# Altium PCB EEM_FMC_Carrier.PcbDoc (part 10 of 19)
Units mm, origin at the board's own origin, x right, y up, seen from the top; angles counter-clockwise.
Board outline 222.9 x 100 mm, 6 copper layers (TopLayer, MidLayer1, MidLayer2, SignalLayer1, Internal Plane 1, BottomLayer), stack 1.528 mm thick; 790 components, 743 nets, 3570 pads, 2277 vias.
Unrouted connection lines stored in the file: 3.
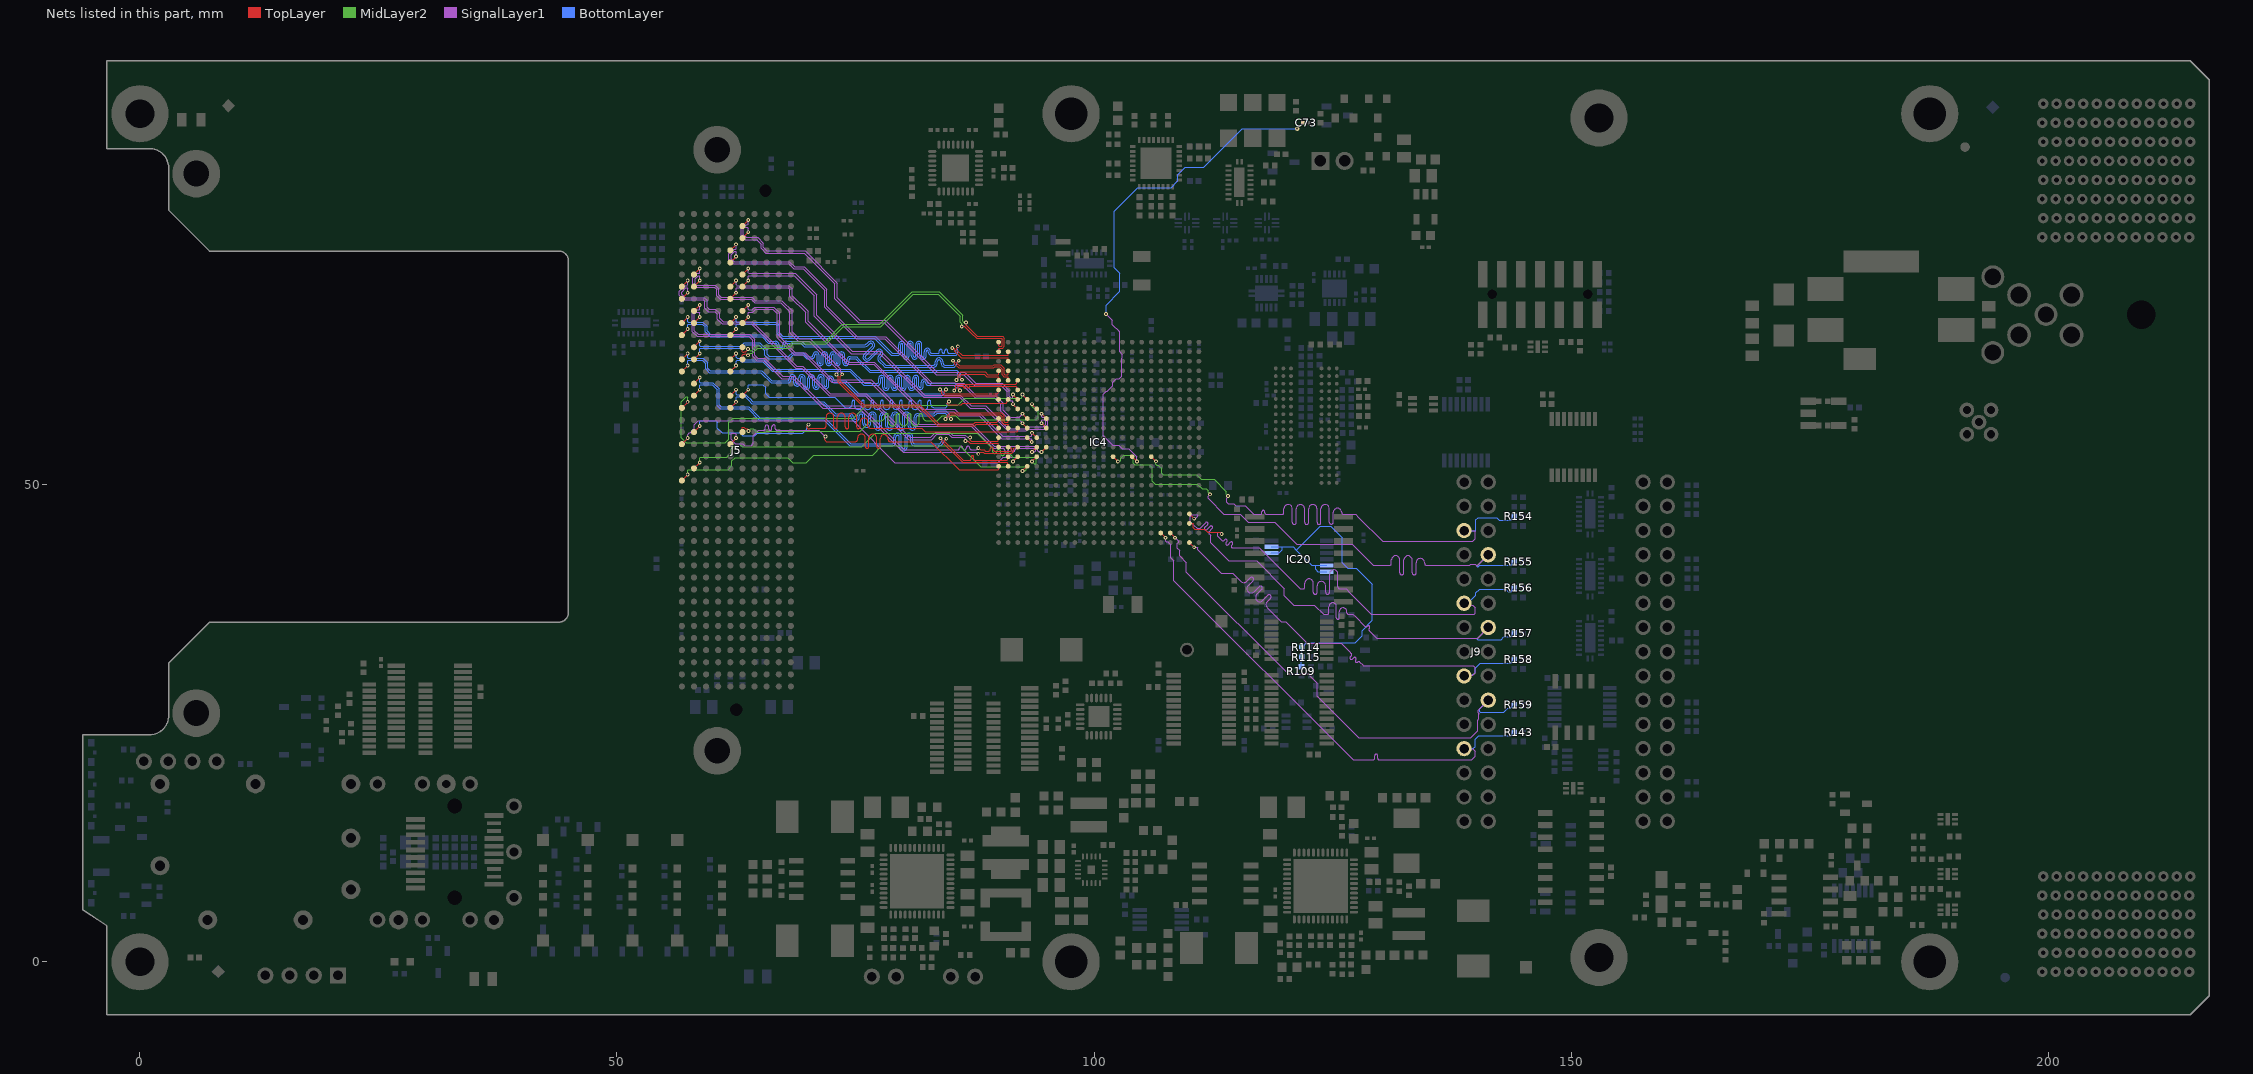
[diagram p12: the nets of this part, all layers, seen from the top]

## Via types
v1: diameter 0.4, hole 0.2, TopLayer to BottomLayer, tented both sides, 1032 vias
v2: diameter 0.5, hole 0.2, TopLayer to BottomLayer, tented both sides, 979 vias
v3: diameter 0.5, hole 0.2, TopLayer to BottomLayer, 162 vias
v4: diameter 0.8, hole 0.5, TopLayer to BottomLayer, tented both sides, 102 vias
v5: diameter 0.6, hole 0.3, TopLayer to BottomLayer, tented both sides, 2 vias

## Nets (pads, with @x,y where several pads share a name; then routed paths per layer and width w, separated by ;. In a path a pad name is that pad's centre, name@x,y a point inside that pad or via, vN(x,y) a via of type N, cw(c..) or ccw(c..) an arc to the next point about the centre after c; other vN are vias at no path point) (continued)
EEM_IO.LVDS_P9: IC4.N17 J9.5 R154.2 | length 63.3
  TopLayer w0.085: IC4.N17@105.998,52.95 106.486,52.462 v1(106.498,52.462)
  MidLayer2 w0.11: v1(106.498,52.462) 106.498,52.139 106.562,52.075 106.752,52.075 107.1,51.726 107.1,51.225 107.263,51.062 110.763,51.062 111.263,50.562 112.613,50.562 113.88,49.295 113.88,49.161 113.88,49.022 114.058,48.843 v1(114.058,48.812)
  SignalLayer1 w0.11: v1(114.058,48.812) 114.058,48.743 113.918,48.603 113.918,48.542 113.918,48.185 114.065,48.038 114.637,48.038 114.875,47.8 115.85,47.8 116.75,46.9 117.138,46.9 117.45,46.9 ccw(c117.45,47.055) 117.605,47.055 117.605,47.163 cw(c117.76,47.163) 117.76,47.318 cw(c117.76,47.163) 117.915,47.163 117.915,47.055 ccw(c118.07,47.055) 118.07,46.9 118.435,46.9 119.525,46.9 119.699,46.9 ccw(c119.699,47.105) 119.904,47.105 119.904,47.475 cw(c120.346,47.475) 120.346,47.917 cw(c120.346,47.475) 120.788,47.475 120.788,46.057 ccw(c120.993,46.057) 120.993,45.852 ccw(c120.993,46.057) 121.198,46.057 121.198,47.475 cw(c121.64,47.475) 121.64,47.917 cw(c121.64,47.475) 122.081,47.475 122.081,46.057 ccw(c122.286,46.057) 122.286,45.852 ccw(c122.286,46.057) 122.491,46.057 122.491,47.475 cw(c122.933,47.475) 122.933,47.917 cw(c122.933,47.475) 123.375,47.475 123.375,46.057 ccw(c123.58,46.057) 123.58,45.852 ccw(c123.58,46.057) 123.785,46.057 123.785,47.475 cw(c124.227,47.475) 124.227,47.917 cw(c124.227,47.475) 124.669,47.475 124.669,46.078 ccw(c124.874,46.078) 124.874,45.873 ccw(c124.874,46.078) 125.079,46.078 125.079,47.105 cw(c125.521,47.105) 125.521,47.547 cw(c125.521,47.105) 125.963,47.105 ccw(c126.168,47.105) 126.168,46.9 127.41,46.9 127.72,46.59 130.247,44.063 139.71,44.063 139.97,44.323 139.97,44.736 139.97,45.142 139.906,45.206 J9.5@138.788,45.206
  BottomLayer w0.085: J9.5@138.788,45.206 139.988,45.206 140.038,45.256 140.038,46.313 140.287,46.562 142.238,46.562 142.494,46.306 143.731,46.306 143.78,46.356 143.78,46.453 R154.2@144.028,46.7
EEM_IO.LVDS_P10: IC4.N13 J9.8 R155.2 | length 60.7
  TopLayer w0.085: IC4.N13@101.998,52.95 v1(102.498,52.45)
  MidLayer2 w0.11: v1(102.498,52.45) 102.554,52.505 102.804,52.505 102.813,52.514 102.813,52.798 103.127,53.112 103.773,53.112 104.112,52.773 104.112,52.263 104.256,52.119 105.791,52.119 106.1,51.81 106.1,50.38 106.405,50.075 110.829,50.075 111.342,49.562 111.763,49.562 111.966,49.359 111.966,49.211 112.145,49.033 v1(112.145,49.002)
  SignalLayer1 w0.11: v1(112.145,49.002) 112.145,48.971 111.966,48.792 111.966,48.584 113.625,46.925 115.335,46.925 116.185,46.075 118.95,46.075 121.263,43.762 127.063,43.762 127.209,43.616 127.307,43.518 128.888,41.937 129.264,41.561 130.8,41.561 130.974,41.561 ccw(c130.974,41.766) 131.179,41.766 131.179,42.119 cw(c131.621,42.119) 131.621,42.561 cw(c131.621,42.119) 132.063,42.119 132.063,40.766 ccw(c132.268,40.766) 132.268,40.561 ccw(c132.268,40.766) 132.473,40.766 132.473,42.119 cw(c132.914,42.119) 132.914,42.561 cw(c132.915,42.119) 133.356,42.119 133.356,40.766 ccw(c133.561,40.766) 133.561,40.561 ccw(c133.561,40.766) 133.766,40.766 133.766,41.837 cw(c134.208,41.837) 134.208,42.279 cw(c134.208,41.837) 134.65,41.837 134.65,41.766 ccw(c134.855,41.766) 134.855,41.561 135.476,41.561 139.376,41.561 139.474,41.659 139.962,41.659 140.096,41.525 140.187,41.525 J9.8@141.328,42.666
  BottomLayer w0.085: J9.8@141.328,42.666 140.168,41.506 140.168,41.436 140.218,41.386 140.288,41.386 140.458,41.556 143.533,41.556 143.72,41.556 143.731,41.556 143.78,41.606 143.78,41.703 R155.2@144.028,41.95
EEM_IO.LVDS_P11: IC4.Y21 J9.11 R156.2 | length 53.1
  TopLayer w0.085: IC4.Y21@109.998,45.95 110.342,45.95 110.392,45.9 110.392,45.505 110.566,45.331 111.619,45.331 111.925,45.025 113.176,45.025 113.36,44.84 v1(113.383,44.84)
  SignalLayer1 w0.11: v1(113.383,44.84) 113.354,44.84 113.173,45.021 113.047,45.021 112.983,44.956 112.983,44.592 113.176,44.399 113.215,44.36 113.408,44.167 ccw(c113.517,44.277) 113.627,44.167 113.702,44.243 cw(c113.812,44.133) 113.922,44.243 cw(c113.812,44.133) 113.922,44.024 113.846,43.948 ccw(c113.956,43.839) 113.846,43.729 ccw(c113.956,43.839) 114.065,43.729 114.299,43.963 cw(c114.409,43.853) 114.518,43.963 cw(c114.409,43.853) 114.518,43.743 114.426,43.652 ccw(c114.536,43.542) 114.536,43.387 114.788,43.387 117.313,43.387 121.613,39.087 121.721,39.087 121.895,39.087 ccw(c121.895,39.292) 122.1,39.292 122.1,39.703 cw(c122.542,39.703) 122.542,40.145 cw(c122.542,39.703) 122.984,39.703 122.984,38.732 ccw(c123.189,38.732) 123.189,38.527 ccw(c123.189,38.732) 123.394,38.732 123.394,39.427 cw(c123.836,39.427) 123.836,39.869 cw(c123.836,39.427) 124.278,39.427 124.278,38.732 ccw(c124.483,38.732) 124.483,38.527 ccw(c124.483,38.732) 124.688,38.732 124.688,40.637 cw(c125.13,40.637) 125.13,41.079 cw(c125.13,40.637) 125.572,40.637 125.572,39.292 ccw(c125.777,39.292) 125.777,39.087 126.438,39.087 126.831,38.694 129.075,36.45 139.865,36.45 139.94,36.525 139.94,37.125 139.689,37.376 138.998,37.376 J9.11@138.788,37.586
  BottomLayer w0.085: J9.11@138.788,37.586 139.198,37.586 140.038,38.426 140.038,38.701 140.412,39.075 143.156,39.075 143.425,38.806 143.731,38.806 143.78,38.856 143.78,38.953 R156.2@144.028,39.2
EEM_IO.LVDS_P12: IC4.W21 J9.14 R157.2 | length 53.3
  TopLayer w0.085: IC4.W21@109.998,46.95 v1(110.498,46.45)
  SignalLayer1 w0.11: v1(110.498,46.45) 110.576,46.45 110.671,46.545 110.699,46.545 110.879,46.725 110.879,46.818 110.815,46.882 110.307,46.882 110.1,46.675 110.1,46.15 110.425,45.825 110.464,45.786 110.825,45.425 111.012,45.425 ccw(c111.012,45.58) 111.122,45.47 111.69,46.038 cw(c111.799,45.929) 111.909,46.038 cw(c111.799,45.929) 111.909,45.819 111.616,45.526 ccw(c111.726,45.417) 111.616,45.307 ccw(c111.726,45.417) 111.835,45.307 112.169,45.641 cw(c112.279,45.531) 112.388,45.641 cw(c112.279,45.531) 112.388,45.422 112.055,45.088 ccw(c112.164,44.978) 112.055,44.869 112.212,44.711 112.212,44.291 112.212,43.938 114.1,42.05 117.035,42.05 119.962,39.123 119.962,38.375 120.944,37.393 123.107,37.393 124.063,36.437 124.3,36.437 124.474,36.437 ccw(c124.474,36.592) 124.629,36.592 124.629,37.239 cw(c125.021,37.239) 125.021,37.631 cw(c125.021,37.239) 125.413,37.239 125.413,36.044 ccw(c125.568,36.044) 125.568,35.889 ccw(c125.568,36.044) 125.723,36.044 125.723,36.712 cw(c126.115,36.712) 126.115,37.104 cw(c126.115,36.712) 126.506,36.712 126.506,36.592 ccw(c126.661,36.592) 126.661,36.437 127.137,36.437 127.375,36.199 128.374,35.199 128.413,35.161 ccw(c128.523,35.27) 128.633,35.161 128.653,35.181 cw(c128.763,35.072) 128.873,35.181 cw(c128.763,35.072) 128.873,34.962 128.852,34.941 ccw(c128.961,34.832) 128.852,34.722 129.136,34.438 129.174,34.399 ; 129.137,34.437 129.174,34.399 ; J9.14@141.328,35.046 140.223,33.941 129.633,33.941 129.174,34.399
  BottomLayer w0.085: J9.14@141.328,35.046 140.168,33.886 140.168,33.816 140.218,33.766 142.666,33.766 142.956,34.056 143.731,34.056 143.78,34.106 143.78,34.203 R157.2@144.028,34.45
EEM_IO.LVDS_P13: IC4.AB21 J9.17 R158.2 | length 50.9
  TopLayer w0.085: IC4.AB21@109.998,43.95 v1(110.498,43.45)
  SignalLayer1 w0.11: v1(110.498,43.45) 110.815,43.45 110.879,43.386 110.879,43.185 113.352,40.713 114.564,40.713 115.276,40.001 115.364,39.913 115.399,39.878 ccw(c115.711,40.191) 116.024,39.878 116.385,40.24 cw(c116.529,40.094) 116.674,40.239 cw(c116.529,40.094) 116.674,39.949 116.146,39.421 ; 116.145,38.795 cw(c116.458,39.108) 116.145,39.42 ; 116.146,38.795 ccw(c116.458,39.108) 116.771,38.795 117.3,39.325 cw(c117.444,39.179) 117.589,39.324 cw(c117.444,39.179) 117.589,39.034 117.061,38.506 ; 117.06,37.88 cw(c117.373,38.193) 117.06,38.505 ; 117.061,37.88 ccw(c117.373,38.193) 117.686,37.88 118.215,38.41 cw(c118.359,38.264) 118.504,38.409 cw(c118.359,38.264) 118.504,38.119 118.144,37.758 ccw(c118.456,37.446) 118.144,37.133 119.18,36.097 119.268,36.009 119.627,35.65 120.09,35.65 122.34,33.4 125.89,33.4 126.732,32.558 126.99,32.3 cw(c126.88,32.191) 126.99,32.081 126.863,31.954 ccw(c126.972,31.845) 126.863,31.735 ccw(c126.972,31.845) 127.082,31.735 127.209,31.862 cw(c127.318,31.752) 127.428,31.862 cw(c127.318,31.752) 127.428,31.643 ccw(c127.538,31.533) 127.428,31.423 ccw(c127.538,31.533) 127.647,31.423 cw(c127.757,31.314) 127.866,31.423 128.167,31.123 128.24,31.05 139.74,31.05 139.94,30.85 139.94,30.3 139.689,30.049 138.871,30.049 J9.17@138.788,29.966
  BottomLayer w0.085: J9.17@138.788,29.966 138.861,30.039 139.666,30.039 139.952,30.325 139.952,30.777 140.481,31.306 143.731,31.306 143.78,31.356 143.78,31.452 R158.2@144.028,31.7
EEM_IO.LVDS_P14: IC4.AA19 J9.20 R159.2 | length 53
  TopLayer w0.085: IC4.AA19@107.998,44.95 v1(108.498,44.45)
  SignalLayer1 w0.11: v1(108.498,44.45) 108.869,44.079 108.869,43.988 108.735,43.854 108.735,43.362 108.975,43.122 108.975,42.54 109.663,41.852 109.663,40.852 120.34,30.175 122.413,30.175 123.388,29.2 123.388,27.852 127.752,23.488 139.498,23.488 140.223,24.213 140.223,25.344 140.35,25.471 140.35,25.957 140.303,26.004 140.303,26.079 140.291,26.091 140.291,26.389 J9.20@141.328,27.426
  BottomLayer w0.085: J9.20@141.328,27.426 140.425,26.523 140.425,26.219 140.498,26.146 141.3,26.146 142.952,26.146 143.362,26.556 143.654,26.556 144.028,26.93 R159.2@144.028,26.95
EEM_IO.LVDS_P15: IC4.AA18 J9.23 R143.2 | length 54.3
  TopLayer w0.085: IC4.AA18@106.998,44.95 v1(107.498,44.45)
  SignalLayer1 w0.11: v1(107.498,44.45) 107.498,44.089 107.562,44.025 107.752,44.025 108.042,43.735 108.042,42.358 108.375,42.025 108.375,39.96 127.148,21.187 128.875,21.187 129.265,21.187 ccw(c129.265,21.342) 129.42,21.342 129.42,21.619 cw(c129.575,21.619) 129.575,21.774 cw(c129.575,21.619) 129.73,21.619 129.73,21.342 ccw(c129.885,21.342) 129.885,21.187 130.25,21.187 ; 130.225,21.187 130.25,21.187 ; J9.23@138.788,22.346 138.808,22.326 139.689,22.326 139.94,22.075 139.94,21.55 139.577,21.187 130.25,21.187
  BottomLayer w0.085: J9.23@138.788,22.346 138.82,22.378 139.753,22.378 139.938,22.563 139.938,23.307 140.312,23.681 143.572,23.681 143.733,23.681 143.783,23.731 143.783,23.803 R143.2@144.03,24.05
FAN_PWM: C73.2 IC4.N15 | length 55.9
  TopLayer w0.125: IC4.N15@103.998,52.95 v1(104.498,52.45) ; v2(121.298,87.325) 121.736,87.763 121.736,87.813 121.873,87.95 C73.2@121.898,87.95
  SignalLayer1 w0.125: v1(101.273,67.9) 101.273,67.875 101.923,67.225 101.923,66.796 102.648,66.071 102.648,66.05 102.673,66.025 102.673,63.929 102.987,63.615 102.987,63.335 102.922,63.27 102.922,61.395 102.638,61.112 102.31,61.112 101.958,60.76 101.958,60.389 101.394,59.825 101.298,59.825 100.973,59.5 100.973,55.125 101.948,54.15 102.573,54.15 102.935,53.788 103.638,53.788 104.498,52.929 v1(104.498,52.45)
  BottomLayer w0.125: v1(101.273,67.9) 101.273,68.825 102.723,70.275 102.723,72.175 102.123,72.775 102.123,78.7 104.562,81.138 108.089,81.138 108.8,81.85 108.8,82.525 109.575,83.3 111.5,83.3 115.525,87.325 v2(121.298,87.325)
FLASH_UP_EN: IC20.5 IC20.6 IC20.12 IC20.13 R109.2 R114.2 R115.2 | length 37.7
  BottomLayer w0.115: IC20.12@118.598,42.85 118.628,42.88 119.428,42.88 119.735,43.187 119.735,43.5 ; IC20.13@118.598,43.5 119.735,43.5 ; R109.2@121.748,30.92 R115.2@121.748,31.94 ; R115.2@121.778,31.95 121.778,32.97 122.01,33.202 122.022,33.202 122.244,33.425 127.383,33.425 128.119,34.161 128.119,34.719 129.184,35.784 129.184,39.566 127.5,41.25 126.575,41.25 125.998,41.827 125.998,44.475 124.798,45.675 123.723,45.675 121.211,43.163 ; IC20.6@124.398,40.9 123.473,40.9 123.223,41.15 123.223,41.55 ; IC20.5@124.398,41.55 123.223,41.55 ; 119.735,43.5 120.873,43.5 121.211,43.163 ; 121.211,43.163 122.823,41.55 123.223,41.55
FMC.HA_N0: IC4.J4 J5.f5 | length 42.2
  TopLayer w0.085: J5.f5@61.878,73.309 62.488,73.919 v1(62.488,73.94) ; v1(92.498,57.45) IC4.J4@92.998,56.95
  SignalLayer1 w0.11: v1(62.488,73.94) 62.488,74.392 62.424,74.457 62.332,74.457 61.975,74.099 61.975,73.685 62.266,73.394 68.081,73.394 68.613,72.862 69.623,72.862 72,70.485 72,68.7 75.163,65.537 78.163,65.537 83.013,60.687 85.417,60.687 85.438,60.665 86.335,60.665 87.663,59.337 89.661,59.337 90.475,58.523 90.475,57.8 91.206,57.069 92.175,57.069 92.498,57.392 v1(92.498,57.45)
FMC.HA_N1: IC4.G3 J5.e3 | length 40.5
  TopLayer w0.085: J5.e3@63.148,75.849 63.758,76.459 v1(63.758,76.48) ; v1(91.498,59.45) IC4.G3@91.998,58.95
  SignalLayer1 w0.11: v1(63.758,76.48) 63.758,76.913 63.675,76.997 63.325,76.997 63.25,76.922 63.25,76.225 63.55,75.925 64.735,75.925 65.337,75.323 65.337,74.875 65.687,74.525 69.71,74.525 73.087,71.148 73.087,69.588 75.45,67.225 78.125,67.225 83.575,61.775 86.435,61.775 87.585,60.625 88.498,60.625 90.375,60.625 91.133,59.867 91.133,59.278 91.342,59.069 91.434,59.069 91.498,59.133 v1(91.498,59.45)
FMC.HA_N2: IC4.L1 J5.k8 | length 43.7
  TopLayer w0.085: J5.k8@56.798,69.499 57.408,70.109 v1(57.408,70.13) ; v1(87.023,54.951) 87.012,54.94 87.012,54.673 87.129,54.556 88.498,54.556 89.9,54.556 ; 89.9,54.556 89.966,54.622 89.966,54.918 IC4.L1@89.998,54.95
  SignalLayer1 w0.11: v1(57.408,70.13) 57.408,70.582 57.344,70.647 57.216,70.647 56.775,70.205 56.775,69.987 57.137,69.625 59.15,69.625 59.45,69.325 59.45,68.61 59.673,68.387 60.323,68.387 60.75,67.96 60.75,67.475 61.113,67.112 64.163,67.112 68.838,62.437 69.463,62.437 72.338,59.562 76.113,59.562 80.7,54.975 82.89,54.975 83.427,55.512 84.863,55.512 85.169,55.206 86.517,55.206 86.749,54.974 87,54.974 v1(87.023,54.951)
FMC.HA_N3: IC4.J1 J5.j7 | length 43.3
  TopLayer w0.085: J5.j7@58.068,70.769 58.678,71.379 v1(58.678,71.4) ; v1(73.609,61.582) 73.601,61.582 73.409,61.39 73.409,60.864 75.885,58.387 81.713,58.387 83.709,56.39 87.412,56.39 87.578,56.556 89.787,56.556 89.919,56.687 89.919,56.871 IC4.J1@89.998,56.95
  SignalLayer1 w0.11: v1(58.678,71.4) 58.678,71.852 58.614,71.917 58.522,71.917 58.2,71.594 58.2,71.001 58.264,70.937 60.311,70.937 60.675,70.573 60.675,69.912 60.925,69.662 64.163,69.662 64.513,69.312 67.261,69.312 68.35,68.223 68.35,66.05 69.113,65.287 70.264,65.287 73.428,62.123 73.428,61.792 73.609,61.61 v1(73.609,61.582)
FMC.HA_N4: IC4.L4 J5.f8 | length 40.9
  TopLayer w0.085: J5.f8@61.878,69.499 62.488,70.109 v1(62.488,70.13) ; IC4.L4@92.998,54.95 v1(93.473,54.475)
  SignalLayer1 w0.11: v1(62.488,70.13) 62.488,70.582 62.552,70.647 67.928,70.647 68.125,70.45 68.125,69.738 69.788,68.075 69.788,67.027 74.19,62.625 76.89,62.625 81.84,57.675 85.315,57.675 85.765,57.225 87.965,57.225 90.346,54.844 93.421,54.844 93.485,54.78 93.485,54.487 v1(93.473,54.475)
FMC.HA_N5: IC4.J6 J5.e7 | length 43.4
  TopLayer w0.085: J5.e7@63.148,70.769 63.758,71.379 v1(63.758,71.4) ; v1(94.498,57.45) IC4.J6@94.998,56.95
  SignalLayer1 w0.11: v1(63.758,71.4) 63.758,71.852 63.822,71.917 68.584,71.917 70.675,69.825 70.675,67.665 74.577,63.763 77.537,63.763 82.137,59.163 85.902,59.163 87.027,58.038 88.498,58.038 88.562,58.038 90.937,55.663 92.923,55.663 93.085,55.825 94.768,55.825 95.167,56.224 95.167,56.76 94.859,57.069 94.562,57.069 94.498,57.133 v1(94.498,57.45)
FMC.HA_N6: IC4.D2 J5.k11 | length 45.4
  TopLayer w0.085: J5.k11@56.798,65.689 57.408,66.299 v1(57.408,66.32) ; v1(85.825,63.008) 85.825,63.003 85.631,62.809 85.631,62.733 85.902,62.462 89.412,62.462 89.519,62.569 90.231,62.569 90.591,62.208 90.591,61.606 90.641,61.556 90.948,61.556 90.998,61.606 IC4.D2@90.998,61.95
  BottomLayer w0.085: v1(57.408,66.32) 57.408,66.799 57.458,66.849 58.926,66.849 59.225,66.55 59.225,66.05 59.75,65.525 65.2,65.525 65.225,65.5 65.875,64.85 66.11,64.85 66.582,64.85 cw(c66.582,64.658) 66.775,64.658 66.775,64.578 ccw(c67.179,64.578) 67.179,64.173 ccw(c67.179,64.578) 67.584,64.578 67.584,64.658 cw(c67.776,64.658) 67.776,64.85 67.925,64.85 69.275,64.85 69.65,64.475 75.6,64.475 75.915,64.475 ccw(c75.916,65.091) 76.35,64.654 76.468,64.772 ; 76.469,64.773 cw(c76.605,64.637) 76.741,64.773 cw(c76.605,64.637) 76.741,64.501 75.869,63.628 75.869,63.624 ccw(c76.186,63.373) 75.9,63.087 ccw(c76.186,63.373) 76.472,63.087 77.321,63.936 ; 77.321,63.937 cw(c77.457,63.8) 77.593,63.937 cw(c77.457,63.8) 77.593,63.664 77.451,63.522 ccw(c77.737,63.236) 77.451,62.949 ; 77.451,62.949 77.65,62.75 77.786,62.614 78.062,62.338 83.025,62.338 83.174,62.338 ccw(c83.174,62.742) 83.578,62.742 83.578,62.894 cw(c83.771,62.894) 83.771,63.087 cw(c83.771,62.894) 83.963,62.894 83.963,62.742 ccw(c84.368,62.742) 84.368,62.338 84.821,62.338 85.331,62.338 85.631,62.637 85.631,62.809 85.825,63.003 v1(85.825,63.008)
FMC.HA_N7: IC4.M2 J5.j10 | length 45.4
  TopLayer w0.085: J5.j10@58.068,66.959 58.678,67.569 v1(58.678,67.59) ; v1(87.873,53.85) 87.932,53.85 87.932,53.841 88.123,53.65 88.5,53.65 88.607,53.543 88.95,53.543 88.993,53.543 ccw(c88.993,53.686) 89.135,53.686 89.135,53.786 cw(c89.278,53.786) 89.278,53.928 cw(c89.278,53.786) 89.42,53.786 89.42,53.686 ccw(c89.563,53.686) 89.563,53.543 89.75,53.543 91.291,53.543 91.392,53.644 91.392,53.821 91.342,53.871 91.077,53.871 IC4.M2@90.998,53.95
  SignalLayer1 w0.11: v1(58.678,67.59) 58.678,68.042 58.614,68.107 58.294,68.107 58.118,67.93 58.118,66.168 58.498,65.787 63.923,65.787 64.45,65.26 64.45,63.562 64.75,63.262 65.472,63.262 67.372,61.362 68.563,61.362 71.663,58.262 75.513,58.262 80.106,53.669 85.275,53.669 85.72,53.669 ccw(c85.72,53.849) 85.9,53.849 cw(c86.08,53.849) 86.26,53.849 ccw(c86.44,53.849) 86.62,53.849 86.62,53.855 cw(c86.8,53.855) 86.98,53.855 86.98,53.849 ccw(c87.16,53.849) 87.16,53.669 87.575,53.669 87.664,53.669 87.845,53.85 v1(87.873,53.85)
FMC.HA_N8: IC4.B2 J5.f11 | length 43.2
  TopLayer w0.085: J5.f11@61.878,65.689 62.488,66.299 v1(62.488,66.32) ; v1(85.723,64.517) 85.723,64.432 85.615,64.324 85.615,64.11 86.169,63.556 90.948,63.556 90.998,63.606 IC4.B2@90.998,63.95
  BottomLayer w0.085: v1(62.488,66.32) 62.488,66.799 62.538,66.849 66.626,66.849 66.813,66.662 66.813,65.837 67.3,65.35 76.975,65.35 78.762,63.563 79.25,63.563 79.399,63.563 ccw(c79.399,63.893) 79.728,63.893 79.728,64.697 cw(c79.846,64.697) 79.963,64.697 79.963,63.504 ccw(c80.293,63.504) 80.622,63.504 80.622,64.697 cw(c80.74,64.697) 80.857,64.697 80.857,63.504 ccw(c81.187,63.504) 81.516,63.504 81.516,64.697 cw(c81.634,64.697) 81.751,64.697 81.751,63.504 ccw(c82.081,63.504) 82.41,63.504 82.41,63.971 cw(c82.528,63.971) 82.645,63.971 82.645,63.893 ccw(c82.975,63.893) 82.975,63.563 83.425,63.563 85.549,63.563 85.723,63.737 85.723,64.113 85.597,64.239 85.597,64.31 85.723,64.436 v1(85.723,64.517)
FMC.HA_N9: IC4.M5 J5.e10 | length 41.3
  TopLayer w0.085: J5.e10@63.148,66.959 63.758,67.569 v1(63.758,67.59) ; v1(93.498,53.45) IC4.M5@93.998,53.95
  SignalLayer1 w0.11: v1(63.758,67.59) 63.758,68.042 63.822,68.107 64.254,68.107 64.534,68.387 66.339,68.387 66.813,67.912 66.813,65.4 68.588,63.625 69.64,63.625 72.49,60.775 76.54,60.775 81.19,56.125 87.125,56.125 89.425,53.825 90.041,53.825 90.456,53.825 cw(c90.456,53.645) 90.636,53.645 ; 90.636,53.644 ccw(c90.816,53.644) 90.996,53.644 ; 90.996,53.645 cw(c91.176,53.645) 91.356,53.645 ccw(c91.536,53.645) 91.716,53.645 cw(c91.896,53.645) 91.896,53.825 92.154,53.825 93.8,53.825 93.88,53.745 93.88,53.575 93.774,53.47 93.518,53.47 v1(93.498,53.45)
FMC.HA_N10: IC4.F1 J5.k14 | length 45.7
  TopLayer w0.085: J5.k14@56.798,61.879 57.408,62.489 v1(57.408,62.51) ; v1(84.473,59.975) 84.277,59.778 84.277,59.648 84.369,59.556 89.875,59.556 89.952,59.633 89.952,59.904 IC4.F1@89.998,59.95
  BottomLayer w0.085: v1(57.408,62.51) 57.408,62.989 57.458,63.039 58.961,63.039 59.288,62.712 59.288,62.149 59.674,61.763 65.062,61.763 66.15,60.675 67.74,60.675 67.888,60.675 ccw(c67.888,61.029) 68.243,61.029 68.243,61.178 cw(c68.385,61.178) 68.385,61.32 cw(c68.385,61.178) 68.528,61.178 68.528,60.706 ccw(c68.882,60.706) 68.882,60.352 ccw(c68.882,60.706) 69.237,60.706 69.237,61.178 cw(c69.379,61.178) 69.379,61.32 cw(c69.379,61.178) 69.522,61.178 69.522,60.373 ccw(c69.876,60.373) 69.876,60.019 ccw(c69.876,60.373) 70.231,60.373 70.231,61.178 cw(c70.373,61.178) 70.373,61.32 cw(c70.373,61.178) 70.516,61.178 70.516,60.373 ccw(c70.87,60.373) 70.87,60.019 ccw(c70.87,60.373) 71.225,60.373 71.225,61.178 cw(c71.367,61.178) 71.367,61.32 cw(c71.367,61.178) 71.51,61.178 71.51,60.441 ccw(c71.864,60.441) 71.864,60.087 ccw(c71.864,60.441) 72.219,60.441 72.219,61.03 cw(c72.361,61.03) 72.361,61.172 cw(c72.361,61.03) 72.504,61.03 ccw(c72.858,61.029) 72.858,60.675 73.27,60.675 73.875,60.675 75.237,59.313 84.03,59.313 84.279,59.562 84.279,59.776 84.473,59.97 v1(84.473,59.975)
FMC.HA_N11: IC4.D1 J5.j13 | length 44.6
  TopLayer w0.085: J5.j13@58.068,63.149 58.678,63.759 v1(58.678,63.78) ; v1(85.575,60.996) 85.575,61.008 85.766,61.199 85.766,61.366 85.769,61.369 85.769,61.544 86.05,61.825 88.586,61.825 88.855,61.556 89.948,61.556 89.998,61.606 IC4.D1@89.998,61.95
  BottomLayer w0.085: v1(58.678,63.78) 58.678,64.259 58.728,64.309 63.034,64.309 63.425,64.7 64.875,64.7 65.513,64.062 65.513,63.587 65.862,63.238 68.088,63.238 68.5,63.65 69.45,63.65 69.875,63.225 70.266,63.225 70.414,63.225 ccw(c70.414,63.555) 70.744,63.555 70.744,63.594 cw(c70.861,63.594) 70.979,63.594 70.979,62.827 ccw(c71.308,62.827) 71.638,62.827 71.638,63.594 cw(c71.755,63.594) 71.873,63.594 71.873,62.827 ccw(c72.202,62.827) 72.532,62.827 72.532,63.594 cw(c72.649,63.594) 72.767,63.594 72.767,62.827 ccw(c73.096,62.827) 73.426,62.827 73.426,63.594 cw(c73.543,63.594) 73.661,63.594 73.661,62.827 ccw(c73.99,62.827) 74.32,62.827 74.32,63.108 cw(c74.437,63.108) 74.437,63.225 75.025,63.225 75.312,62.938 76.475,61.775 85.55,61.775 85.769,61.556 85.769,61.195 85.575,61.001 v1(85.575,60.996)
FMC.HA_N12: IC4.E3 J5.f14 | length 45.4
  TopLayer w0.085: J5.f14@61.878,61.879 62.488,62.489 v1(62.488,62.51) ; v1(85.348,59.9) 85.348,59.93 85.525,60.107 85.525,60.375 85.706,60.556 86.187,60.556 91.812,60.556 91.92,60.664 91.92,60.872 IC4.E3@91.998,60.95
  BottomLayer w0.085: v1(62.488,62.51) 62.488,62.927 62.6,63.039 62.895,63.039 63.021,62.913 65.287,62.913 66.284,61.916 74.384,61.916 75.887,60.413 77.15,60.413 77.299,60.413 ccw(c77.299,60.742) 77.628,60.742 77.628,61.132 cw(c77.746,61.132) 77.863,61.132 77.863,60.216 ccw(c78.193,60.216) 78.522,60.216 78.522,61.132 cw(c78.64,61.132) 78.757,61.132 78.757,60.216 ccw(c79.087,60.216) 79.416,60.216 79.416,61.132 cw(c79.534,61.132) 79.651,61.132 79.651,60.216 ccw(c79.981,60.216) 80.31,60.216 80.31,61.132 cw(c80.428,61.132) 80.545,61.132 80.545,60.216 ccw(c80.875,60.216) 81.204,60.216 81.204,61.132 cw(c81.322,61.132) 81.439,61.132 81.439,60.31 ccw(c81.769,60.31) 82.098,60.31 82.098,60.743 cw(c82.216,60.743) 82.333,60.743 ccw(c82.663,60.742) 82.663,60.413 83.425,60.413 85.304,60.413 85.542,60.175 85.542,60.099 85.348,59.905 v1(85.348,59.9)
FMC.HA_N13: IC4.A1 J5.e13 | length 34.5
  TopLayer w0.085: J5.e13@63.148,63.149 63.148,63.601 63.225,63.678 63.383,63.678 63.445,63.74 63.516,63.74 63.681,63.575 v1(63.723,63.575) ; v1(86.142,66.608) 86.145,66.604 86.419,66.604 87.087,65.936 87.686,65.338 90.325,65.338 90.4,65.263 90.4,64.597 90.35,64.548 90.048,64.548 89.998,64.597 IC4.A1@89.998,64.95
  MidLayer2 w0.11: v1(63.723,63.575) 63.942,63.794 64.2,63.794 64.731,64.325 68.043,64.325 68.499,64.781 71.916,64.781 73.71,66.575 77.635,66.575 81.06,70 83.675,70 85.983,67.692 85.983,67.023 86.122,66.884 86.122,66.628 v1(86.142,66.608)
FMC.HA_N14: IC4.N2 J5.j16 | length 44.8
  TopLayer w0.085: J5.j16@58.068,59.339 58.678,59.949 v1(58.678,59.97) ; v1(84.521,54.823) 84.521,54.816 84.328,54.623 84.328,54.547 86.32,52.556 86.525,52.556 86.977,52.556 ccw(c86.977,52.699) 87.12,52.699 87.12,52.899 cw(c87.262,52.899) 87.262,53.042 cw(c87.262,52.899) 87.405,52.899 87.405,52.699 ccw(c87.547,52.699) 87.547,52.556 87.875,52.556 90.85,52.556 90.939,52.645 90.939,52.891 IC4.N2@90.998,52.95
  BottomLayer w0.085: v1(58.678,59.97) 58.678,60.449 58.728,60.499 59.964,60.499 60.488,59.975 60.488,58.312 60.837,57.963 63.737,57.963 64.864,56.836 71.664,56.836 74.412,54.088 78.175,54.088 78.818,54.088 ccw(c78.818,54.492) 79.223,54.492 79.223,54.995 cw(c79.415,54.995) 79.415,55.187 cw(c79.415,54.995) 79.608,54.995 79.608,53.959 ccw(c80.012,53.959) 80.012,53.555 ccw(c80.012,53.959) 80.417,53.959 80.417,54.995 cw(c80.609,54.995) 80.609,55.187 cw(c80.609,54.995) 80.802,54.995 80.802,54.492 ccw(c81.206,54.492) 81.206,54.088 81.952,54.088 83.15,54.088 83.378,54.088 cw(c83.378,53.996) 83.47,53.996 83.47,53.952 ccw(c83.563,53.952) 83.563,53.86 ccw(c83.563,53.952) 83.655,53.952 83.655,53.996 cw(c83.748,53.996) 83.748,54.088 83.898,54.088 83.971,54.161 84.328,54.519 84.328,54.623 84.521,54.816 v1(84.521,54.823)
FMC.HA_N15: IC4.J2 J5.f17 | length 47.4
  TopLayer w0.085: J5.f17@61.878,58.069 62.488,58.679 v1(62.488,58.7) ; v1(84.423,56.892) 84.423,56.897 84.617,57.091 84.617,57.249 84.93,57.562 90.263,57.562 90.591,57.233 90.591,56.606 90.641,56.556 90.948,56.556 90.998,56.606 IC4.J2@90.998,56.95
  BottomLayer w0.085: v1(62.488,58.7) 62.488,59.179 62.538,59.229 63.421,59.229 63.75,58.9 64.15,58.5 71.6,58.5 72.85,57.25 73.44,57.25 74.387,57.25 cw(c74.387,57.058) 74.58,57.058 ccw(c74.984,57.057) 74.984,56.653 ccw(c74.984,57.057) 75.389,57.057 75.389,57.217 cw(c75.581,57.217) 75.581,57.409 cw(c75.581,57.217) 75.774,57.217 75.774,56.429 ccw(c76.178,56.429) 76.178,56.024 ccw(c76.178,56.429) 76.583,56.429 76.583,57.217 cw(c76.775,57.217) 76.775,57.409 cw(c76.775,57.217) 76.968,57.217 76.968,56.137 ccw(c77.372,56.137) 77.372,55.733 ccw(c77.372,56.137) 77.777,56.137 77.777,57.217 cw(c77.969,57.217) 77.969,57.409 cw(c77.969,57.217) 78.162,57.217 78.162,56.137 ccw(c78.566,56.137) 78.566,55.733 ccw(c78.566,56.137) 78.971,56.137 78.971,57.217 cw(c79.163,57.217) 79.163,57.409 cw(c79.163,57.217) 79.356,57.217 79.356,56.137 ccw(c79.76,56.137) 79.76,55.733 ccw(c79.76,56.137) 80.165,56.137 80.165,57.217 cw(c80.357,57.217) 80.357,57.409 cw(c80.357,57.217) 80.55,57.217 80.55,56.137 ccw(c80.954,56.137) 80.954,55.733 ccw(c80.954,56.137) 81.359,56.137 81.359,57.058 cw(c81.551,57.058) 81.551,57.25 81.7,57.25 83.275,57.25 83.55,57.525 84.392,57.525 84.617,57.3 84.617,57.167 84.617,57.091 84.423,56.897 v1(84.423,56.892)
FMC.HA_N16: IC4.G2 J5.e16 | length 44.7
  TopLayer w0.085: J5.e16@63.148,59.339 63.758,59.949 v1(63.758,59.97) ; v1(84.81,58.733) 84.776,58.733 84.597,58.553 84.597,58.477 84.67,58.404 86.104,58.404 86.256,58.556 90.787,58.556 90.919,58.687 90.919,58.871 IC4.G2@90.998,58.95
  BottomLayer w0.085: v1(63.758,59.97) 63.758,60.449 63.808,60.499 65.301,60.499 65.588,60.212 65.588,59.562 65.95,59.2 72.825,59.2 73.937,58.088 74.142,58.088 74.29,58.088 ccw(c74.29,58.442) 74.645,58.442 74.645,58.72 cw(c74.787,58.72) 74.787,58.862 cw(c74.787,58.72) 74.93,58.72 74.93,58.244 ccw(c75.284,58.244) 75.284,57.889 ccw(c75.284,58.244) 75.639,58.244 75.639,58.72 cw(c75.781,58.72) 75.781,58.862 cw(c75.781,58.72) 75.924,58.72 75.924,58.244 ccw(c76.278,58.244) 76.278,57.889 ccw(c76.278,58.244) 76.633,58.244 76.633,58.72 cw(c76.775,58.72) 76.775,58.862 cw(c76.775,58.72) 76.918,58.72 76.918,58.244 ccw(c77.272,58.244) 77.272,57.889 ccw(c77.272,58.244) 77.627,58.244 77.627,58.72 cw(c77.769,58.72) 77.769,58.862 cw(c77.769,58.72) 77.912,58.72 77.912,58.244 ccw(c78.266,58.244) 78.266,57.889 ccw(c78.266,58.244) 78.621,58.244 78.621,58.72 cw(c78.763,58.72) 78.763,58.862 cw(c78.763,58.72) 78.906,58.72 78.906,58.244 ccw(c79.26,58.244) 79.26,57.889 ccw(c79.26,58.244) 79.615,58.244 79.615,58.72 cw(c79.757,58.72) 79.757,58.862 cw(c79.757,58.72) 79.9,58.72 79.9,58.244 ccw(c80.254,58.244) 80.254,57.889 ccw(c80.254,58.244) 80.609,58.244 80.609,58.72 cw(c80.751,58.72) 80.751,58.862 cw(c80.751,58.72) 80.894,58.72 80.894,58.244 ccw(c81.248,58.244) 81.248,57.889 ccw(c81.248,58.244) 81.603,58.244 81.603,58.72 cw(c81.745,58.72) 81.745,58.862 cw(c81.745,58.72) 81.888,58.72 81.888,58.244 ccw(c82.242,58.244) 82.242,57.889 ccw(c82.242,58.244) 82.597,58.244 82.597,58.72 cw(c82.739,58.72) 82.739,58.862 cw(c82.739,58.72) 82.882,58.72 82.882,58.442 ccw(c83.236,58.442) 83.236,58.088 84.22,58.088 84.437,58.088 84.611,58.262 84.611,58.539 84.804,58.733 v1(84.81,58.733)
FMC.HA_N17: IC4.G4 J5.k17 | length 46
  TopLayer w0.085: J5.k17@56.798,58.069 57.408,58.679 v1(57.408,58.7) ; v1(92.498,59.45) IC4.G4@92.998,58.95
  MidLayer2 w0.11: v1(57.408,58.7) 57.408,59.152 57.344,59.217 57.252,59.217 56.75,58.714 56.75,54.925 57.282,54.393 61.332,54.393 61.738,54.798 61.738,56.598 62.115,56.975 74.79,56.975 76.152,58.337 85.727,58.337 86.465,59.075 88.498,59.075 89.572,59.075 92.378,59.075 92.442,59.139 92.442,59.395 v1(92.498,59.45)
FMC.HA_N18: IC4.K3 J5.j19 | length 47.2
  TopLayer w0.085: J5.j19@58.068,55.529 58.678,56.139 v1(58.678,56.16) ; v1(70.073,56.3) 70.073,56.294 69.879,56.1 69.879,56.025 70.004,55.9 70.205,55.9 70.254,55.95 71.575,55.95 71.724,55.95 ccw(c71.724,56.142) 71.916,56.142 71.916,57.104 cw(c72.321,57.104) 72.321,57.508 cw(c72.321,57.104) 72.725,57.104 72.725,56.083 ccw(c72.918,56.083) 72.918,55.891 ccw(c72.918,56.083) 73.11,56.083 73.11,57.104 cw(c73.515,57.104) 73.515,57.508 cw(c73.515,57.104) 73.919,57.104 73.919,56.083 ccw(c74.112,56.083) 74.112,55.891 ccw(c74.112,56.083) 74.304,56.083 74.304,57.104 cw(c74.709,57.104) 74.709,57.508 cw(c74.709,57.104) 75.113,57.104 75.113,56.083 ccw(c75.306,56.083) 75.306,55.891 ccw(c75.306,56.083) 75.498,56.083 75.498,56.584 cw(c75.903,56.584) 75.903,56.988 cw(c75.903,56.584) 76.307,56.584 76.307,56.142 ccw(c76.5,56.142) 76.5,55.95 77.491,55.95 81.034,55.95 ; 81.035,55.95 81.925,55.95 82.33,55.545 91.948,55.545 91.998,55.595 IC4.K3@91.998,55.95
  BottomLayer w0.085: v1(58.678,56.16) 58.678,56.639 58.728,56.689 60.361,56.689 60.5,56.55 60.525,56.525 60.525,55.937 61.024,55.438 62.887,55.438 63.206,55.119 64.419,55.119 64.713,55.413 69.463,55.413 69.879,55.829 69.879,56.101 70.073,56.295 v1(70.073,56.3)
FMC.HA_N19: IC4.P1 J5.f20 | length 41.8
  TopLayer w0.085: J5.f20@61.878,54.259 62.488,54.869 v1(62.488,54.89) ; v1(71.853,55.076) 71.793,55.016 71.793,54.894 71.768,54.869 71.768,54.698 71.928,54.537 74.875,54.537 75.024,54.537 ccw(c75.024,54.729) 75.216,54.729 75.216,54.909 cw(c75.621,54.909) 75.621,55.313 cw(c75.621,54.909) 76.025,54.909 76.025,54.021 ccw(c76.218,54.021) 76.218,53.829 ccw(c76.218,54.021) 76.41,54.021 76.41,54.909 cw(c76.815,54.909) 76.815,55.313 cw(c76.815,54.909) 77.219,54.909 77.219,54.021 ccw(c77.412,54.021) 77.412,53.829 ccw(c77.412,54.021) 77.604,54.021 77.604,54.842 cw(c78.009,54.842) 78.009,55.247 cw(c78.009,54.842) 78.413,54.842 78.413,54.729 ccw(c78.606,54.729) 78.606,54.537 79.13,54.537 82.888,54.537 85.869,51.556 89.948,51.556 89.998,51.606 IC4.P1@89.998,51.95
  SignalLayer1 w0.11: v1(62.488,54.89) 62.488,55.294 62.375,55.407 62.05,55.407 61.95,55.307 61.95,54.75 62.4,54.3 63.2,54.3 63.407,54.093 64.057,54.093 64.3,54.335 64.3,55.135 64.877,55.712 65.05,55.712 65.345,55.712 ccw(c65.345,55.892) 65.525,55.892 65.525,56.085 cw(c65.705,56.085) 65.885,56.085 65.885,55.892 ccw(c66.065,55.892) 66.245,55.892 66.245,56.103 cw(c66.425,56.103) 66.605,56.103 66.605,55.892 ccw(c66.785,55.892) 66.785,55.712 67.2,55.712 71.135,55.712 71.599,55.248 71.664,55.183 71.668,55.183 71.775,55.076 v1(71.853,55.076)
FMC.HA_N20: IC4.H5 J5.e19 | length 42.5
  TopLayer w0.085: J5.e19@63.148,55.529 63.148,56.007 63.198,56.058 63.301,56.058 63.477,55.881 63.636,55.881 63.798,55.719 v1(63.798,55.65) ; v1(93.498,58.45) IC4.H5@93.998,57.95
  MidLayer2 w0.11: v1(63.798,55.65) 63.798,55.663 64.004,55.869 64.271,55.869 64.652,55.488 65.538,55.488 65.688,55.638 75.523,55.638 76.616,56.731 77.5,56.731 77.674,56.731 ccw(c77.674,57.148) 78.091,57.148 78.091,57.273 cw(c78.271,57.273) 78.451,57.273 78.451,56.593 ccw(c78.868,56.593) 79.285,56.593 79.285,57.273 cw(c79.465,57.273) 79.645,57.273 79.645,56.593 ccw(c80.061,56.593) 80.478,56.593 80.478,57.273 cw(c80.658,57.273) 80.838,57.273 80.838,56.593 ccw(c81.255,56.593) 81.672,56.593 81.672,57.273 cw(c81.852,57.273) 82.032,57.273 82.032,57.148 ccw(c82.449,57.148) 82.449,56.731 83.506,56.731 83.556,56.731 84.088,57.263 85.502,57.263 85.927,56.838 93.898,56.838 94.162,57.102 94.162,57.798 93.892,58.069 93.65,58.069 93.531,58.187 93.531,58.417 v1(93.498,58.45)
FMC.HA_N21: IC4.N3 J5.k20 | length 39.8
  TopLayer w0.085: J5.k20@56.798,54.259 57.408,54.869 v1(57.408,54.89) ; v1(91.498,52.45) IC4.N3@91.998,52.95
  SignalLayer1 w0.11: v1(57.408,54.89) 57.408,55.265 57.596,55.452 57.694,55.452 58.103,55.861 58.103,56.293 58.535,56.725 74.75,56.725 79.137,52.338 89.898,52.338 90.473,52.913 91.741,52.913 91.805,52.849 91.805,52.757 v1(91.498,52.45)
FMC.HA_N22: IC4.N5 J5.j22 | length 42.2
  TopLayer w0.085: J5.j22@58.068,51.719 58.678,52.329 v1(58.678,52.35) ; v1(93.498,52.45) IC4.N5@93.998,52.95
  MidLayer2 w0.11: v1(58.678,52.35) 58.678,52.802 58.742,52.867 61.49,52.867 61.9,53.277 61.9,53.725 62.325,54.15 62.95,54.15 63.118,53.982 75.642,53.982 77.073,55.413 87.764,55.413 88.515,54.662 89.33,53.847 cw(c89.185,53.702) 89.39,53.702 89.39,53.486 ccw(c89.595,53.486) 89.595,53.281 ccw(c89.595,53.486) 89.8,53.486 89.8,53.495 cw(c90.005,53.495) 90.005,53.7 cw(c90.005,53.495) 90.21,53.495 90.21,53.268 ccw(c90.415,53.268) 90.415,53.063 ccw(c90.415,53.268) 90.62,53.268 90.62,53.275 cw(c90.825,53.275) 90.97,53.42 91.255,53.135 91.508,52.882 93.74,52.882 93.93,52.692 93.93,52.238 93.866,52.174 93.774,52.174 v1(93.498,52.45)
FMC.HA_N23: IC4.P4 J5.k23 | length 40.9
  TopLayer w0.085: J5.k23@56.798,50.449 57.408,51.059 v1(57.408,51.08) ; v1(92.498,51.45) IC4.P4@92.998,51.95
  MidLayer2 w0.11: v1(57.408,51.08) 57.408,51.532 57.472,51.597 61.672,51.597 62.05,51.975 62.05,52.5 62.375,52.825 67.915,52.825 68.427,52.313 69.863,52.313 70.638,53.088 76.788,53.088 77.775,54.075 85.915,54.075 88.115,51.875 92.815,51.875 92.879,51.811 92.879,51.575 92.774,51.47 92.518,51.47 v1(92.498,51.45)
FMC.HA_P0: IC4.K4 J5.f4 | length 43
  TopLayer w0.085: J5.f4@61.878,74.579 62.488,75.189 v1(62.488,75.21) ; v1(92.498,56.45) IC4.K4@92.998,55.95
  SignalLayer1 w0.11: v1(62.488,75.21) 62.488,74.758 62.424,74.694 62.234,74.694 61.738,74.197 61.738,73.587 62.168,73.157 67.982,73.157 68.515,72.625 69.525,72.625 71.763,70.387 71.763,68.602 75.065,65.3 78.065,65.3 82.915,60.45 85.319,60.45 85.34,60.428 86.236,60.428 87.565,59.1 89.563,59.1 90.238,58.425 90.238,57.702 91.108,56.832 92.175,56.832 92.498,56.509 v1(92.498,56.45)
FMC.HA_P1: IC4.H3 J5.e2 | length 41.3
  TopLayer w0.085: J5.e2@63.148,77.119 63.758,77.729 v1(63.758,77.75) ; v1(91.498,58.45) IC4.H3@91.998,57.95
  SignalLayer1 w0.11: v1(63.758,77.75) 63.758,77.317 63.675,77.234 63.227,77.234 63.013,77.02 63.013,76.127 63.452,75.688 64.637,75.688 65.1,75.225 65.1,74.777 65.589,74.288 69.612,74.288 72.85,71.05 72.85,69.49 75.352,66.988 78.027,66.988 83.477,61.538 86.337,61.538 87.487,60.388 88.498,60.388 90.277,60.388 90.896,59.769 90.896,59.18 91.244,58.832 91.434,58.832 91.498,58.767 v1(91.498,58.45)
FMC.HA_P2: IC4.M1 J5.k7 | length 44.4
  TopLayer w0.085: J5.k7@56.798,70.769 57.408,71.379 v1(57.408,71.4) ; v1(86.533,54.604) 86.556,54.582 86.804,54.582 87.042,54.344 88.498,54.344 89.9,54.344 89.966,54.278 89.966,53.982 IC4.M1@89.998,53.95
  SignalLayer1 w0.11: v1(57.408,71.4) 57.408,70.948 57.344,70.884 57.118,70.884 56.538,70.303 56.538,69.889 57.039,69.388 59.052,69.388 59.213,69.227 59.213,68.512 59.575,68.15 60.225,68.15 60.513,67.862 60.513,67.377 61.015,66.875 64.065,66.875 68.74,62.2 69.365,62.2 72.24,59.325 76.015,59.325 80.602,54.738 82.988,54.738 83.525,55.275 84.765,55.275 85.071,54.969 86.419,54.969 86.51,54.877 86.51,54.627 v1(86.533,54.604)
FMC.HA_P3: IC4.K1 J5.j6 | length 44.1
  TopLayer w0.085: J5.j6@58.068,72.039 58.678,72.649 v1(58.678,72.67) ; v1(73.01,61.575) 73.01,61.557 73.197,61.369 73.197,60.776 75.798,58.175 81.625,58.175 83.622,56.178 87.5,56.178 87.666,56.344 88.162,56.344 88.187,56.344 89.787,56.344 89.919,56.212 89.919,56.029 IC4.K1@89.998,55.95
  SignalLayer1 w0.11: v1(58.678,72.67) 58.678,72.218 58.614,72.154 58.424,72.154 57.963,71.692 57.963,70.903 58.166,70.7 60.213,70.7 60.438,70.475 60.438,69.814 60.827,69.425 64.065,69.425 64.415,69.075 67.163,69.075 68.113,68.125 68.113,65.952 69.015,65.05 70.166,65.05 73.191,62.025 73.191,61.784 73.01,61.603 v1(73.01,61.575)
FMC.HA_P4: IC4.L5 J5.f7 | length 41
  TopLayer w0.085: J5.f7@61.878,70.769 62.488,71.379 v1(62.488,71.4) ; v1(93.498,55.45) IC4.L5@93.998,54.95
  SignalLayer1 w0.11: v1(62.488,71.4) 62.488,70.948 62.552,70.884 68.027,70.884 68.362,70.548 68.362,69.836 70.025,68.173 70.025,67.125 74.288,62.862 76.988,62.862 81.938,57.912 85.413,57.912 85.863,57.462 88.063,57.462 90.444,55.081 93.421,55.081 93.485,55.145 93.485,55.438 v1(93.498,55.45)
FMC.HA_P5: IC4.K6 J5.e6 | length 42.6
  TopLayer w0.085: J5.e6@63.148,72.039 63.758,72.649 v1(63.758,72.67) ; v1(94.498,56.45) IC4.K6@94.998,55.95
  SignalLayer1 w0.11: v1(63.758,72.67) 63.758,72.242 63.847,72.154 68.682,72.154 70.912,69.923 70.912,67.763 74.675,64 77.635,64 82.235,59.4 86,59.4 87.125,58.275 88.498,58.275 88.66,58.275 91.035,55.9 92.825,55.9 92.987,56.062 94.67,56.062 94.93,56.322 94.93,56.662 94.76,56.832 94.562,56.832 94.498,56.767 v1(94.498,56.45)
FMC.HA_P6: IC4.E2 J5.k10 | length 45.4
  TopLayer w0.085: J5.k10@56.798,66.959 57.408,67.569 v1(57.408,67.59) ; v1(85.225,63.008) 85.225,63.003 85.419,62.809 85.419,62.645 85.814,62.25 89.5,62.25 89.607,62.357 90.143,62.357 90.379,62.121 90.379,61.518 90.553,61.344 90.948,61.344 90.998,61.294 IC4.E2@90.998,60.95
  BottomLayer w0.085: v1(57.408,67.59) 57.408,67.111 57.458,67.061 59.014,67.061 59.437,66.638 59.437,66.138 59.838,65.737 65.288,65.737 65.375,65.65 65.963,65.062 66.11,65.062 66.582,65.062 cw(c66.582,64.658) 66.987,64.658 66.987,64.578 ccw(c67.179,64.578) 67.179,64.385 ccw(c67.179,64.578) 67.372,64.578 67.372,64.658 cw(c67.776,64.658) 67.776,65.062 67.925,65.062 69.363,65.062 69.738,64.687 75.812,64.687 75.915,64.687 ccw(c75.916,65.091) 76.201,64.805 76.35,64.954 76.354,64.954 cw(c76.605,64.637) 76.891,64.923 cw(c76.605,64.637) 76.892,64.352 76.05,63.51 ccw(c76.186,63.373) 76.05,63.237 ccw(c76.186,63.373) 76.322,63.237 77.202,64.117 77.206,64.117 cw(c77.457,63.8) 77.743,64.086 cw(c77.457,63.8) 77.744,63.516 77.601,63.372 ccw(c77.737,63.236) 77.601,63.099 77.8,62.9 77.936,62.764 78.15,62.55 83.025,62.55 83.174,62.55 ccw(c83.174,62.742) 83.366,62.742 83.366,62.894 cw(c83.771,62.894) 83.771,63.299 cw(c83.771,62.894) 84.175,62.894 84.175,62.742 ccw(c84.368,62.742) 84.368,62.55 84.821,62.55 85.244,62.55 85.419,62.725 85.419,62.809 85.225,63.003 v1(85.225,63.008)
FMC.HA_P7: IC4.M3 J5.j9 | length 45.2
  TopLayer w0.085: J5.j9@58.068,68.229 58.678,68.839 v1(58.678,68.86) ; v1(87.873,53.25) 87.906,53.25 88.094,53.438 88.412,53.438 88.519,53.331 91.379,53.331 91.604,53.557 91.604,53.812 91.688,53.896 91.944,53.896 IC4.M3@91.998,53.95
  SignalLayer1 w0.11: v1(58.678,68.86) 58.678,68.408 58.614,68.344 58.196,68.344 57.881,68.029 57.881,66.069 58.4,65.55 63.825,65.55 64.213,65.162 64.213,63.464 64.652,63.025 65.374,63.025 67.274,61.125 68.465,61.125 71.565,58.025 75.415,58.025 80.008,53.432 87.664,53.432 87.845,53.25 v1(87.873,53.25)
FMC.HA_P8: IC4.C2 J5.f10 | length 44.3
  TopLayer w0.085: J5.f10@61.878,66.959 62.488,67.569 v1(62.488,67.59) ; v1(85.145,64.356) 85.205,64.296 85.328,64.296 85.403,64.221 85.403,64.022 86.081,63.344 90.948,63.344 90.998,63.294 IC4.C2@90.998,62.95
  BottomLayer w0.085: v1(62.488,67.59) 62.488,67.111 62.538,67.061 66.714,67.061 67.025,66.75 67.025,65.925 67.388,65.562 77.063,65.562 78.85,63.775 79.25,63.775 79.399,63.775 ccw(c79.399,63.893) 79.516,63.893 79.516,64.697 cw(c79.846,64.697) 80.175,64.697 80.175,63.504 ccw(c80.293,63.504) 80.41,63.504 80.41,64.697 cw(c80.74,64.697) 81.069,64.697 81.069,63.504 ccw(c81.187,63.504) 81.304,63.504 81.304,64.697 cw(c81.634,64.697) 81.963,64.697 81.963,63.504 ccw(c82.081,63.504) 82.198,63.504 82.198,63.971 cw(c82.528,63.971) 82.857,63.971 82.857,63.893 ccw(c82.975,63.893) 82.975,63.775 83.425,63.775 83.437,63.775 83.657,63.775 ccw(c83.657,63.918) 83.8,63.918 83.8,64.062 cw(c83.942,64.062) 83.942,64.204 cw(c83.942,64.062) 84.085,64.062 84.085,63.918 ccw(c84.227,63.918) 84.227,63.775 ccw(c84.227,63.918) 84.37,63.918 84.37,64.062 cw(c84.512,64.062) 84.512,64.204 cw(c84.512,64.062) 84.655,64.062 84.655,63.918 ccw(c84.797,63.918) 84.797,63.775 85.125,63.775 85.461,63.775 85.511,63.825 85.511,64.025 85.18,64.356 v1(85.145,64.356)
FMC.HA_P9: IC4.M6 J5.e9 | length 40.8
  TopLayer w0.085: J5.e9@63.148,68.229 63.758,68.839 v1(63.758,68.86) ; v1(94.498,53.45) IC4.M6@94.998,53.95
  SignalLayer1 w0.11: v1(63.758,68.86) 63.758,68.408 63.822,68.344 64.156,68.344 64.436,68.624 66.437,68.624 67.05,68.01 67.05,65.498 68.686,63.862 69.738,63.862 72.588,61.012 76.638,61.012 81.288,56.362 87.223,56.362 89.523,54.062 93.898,54.062 94.117,53.844 94.117,53.575 94.222,53.47 94.478,53.47 v1(94.498,53.45)
FMC.HA_P10: IC4.G1 J5.k13 | length 45.7
  TopLayer w0.085: J5.k13@56.798,63.149 57.408,63.759 v1(57.408,63.78) ; v1(83.873,59.986) 83.873,59.976 84.065,59.785 84.065,59.56 84.281,59.344 89.875,59.344 89.952,59.267 89.952,58.996 IC4.G1@89.998,58.95
  BottomLayer w0.085: v1(57.408,63.78) 57.408,63.301 57.458,63.251 59.049,63.251 59.5,62.8 59.5,62.237 59.762,61.975 65.15,61.975 66.238,60.887 67.74,60.887 67.888,60.887 ccw(c67.888,61.029) 68.031,61.029 68.031,61.178 cw(c68.385,61.178) 68.385,61.532 cw(c68.385,61.178) 68.74,61.178 68.74,60.706 ccw(c68.882,60.706) 68.882,60.564 ccw(c68.882,60.706) 69.025,60.706 69.025,61.178 cw(c69.379,61.178) 69.379,61.532 cw(c69.379,61.178) 69.734,61.178 69.734,60.373 ccw(c69.876,60.373) 69.876,60.231 ccw(c69.876,60.373) 70.019,60.373 70.019,61.178 cw(c70.373,61.178) 70.373,61.532 cw(c70.373,61.178) 70.728,61.178 70.728,60.373 ccw(c70.87,60.373) 70.87,60.231 ccw(c70.87,60.373) 71.013,60.373 71.013,61.178 cw(c71.367,61.178) 71.367,61.532 cw(c71.367,61.178) 71.722,61.178 71.722,60.441 ccw(c71.864,60.441) 71.864,60.299 ccw(c71.864,60.441) 72.007,60.441 72.007,61.03 cw(c72.361,61.03) 72.361,61.384 cw(c72.361,61.03) 72.716,61.03 ccw(c72.858,61.029) 72.858,60.887 73.27,60.887 73.963,60.887 75.325,59.525 83.942,59.525 84.067,59.65 84.067,59.787 83.873,59.981 v1(83.873,59.986)
FMC.HA_P11: IC4.E1 J5.j12 | length 44.6
  TopLayer w0.085: J5.j12@58.068,64.419 58.678,65.029 v1(58.678,65.05) ; v1(86.175,61.012) 86.174,61.012 85.978,61.208 85.978,61.278 85.981,61.281 85.981,61.456 86.138,61.613 88.498,61.613 88.767,61.344 89.948,61.344 89.998,61.294 IC4.E1@89.998,60.95
  BottomLayer w0.085: v1(58.678,65.05) 58.678,64.571 58.728,64.521 62.946,64.521 63.337,64.912 64.963,64.912 65.725,64.15 65.725,63.675 65.95,63.45 68,63.45 68.412,63.862 69.538,63.862 69.963,63.437 70.266,63.437 70.414,63.437 ccw(c70.414,63.555) 70.532,63.555 70.532,63.594 cw(c70.861,63.594) 71.191,63.594 71.191,62.827 ccw(c71.308,62.827) 71.426,62.827 71.426,63.594 cw(c71.755,63.594) 72.085,63.594 72.085,62.827 ccw(c72.202,62.827) 72.32,62.827 72.32,63.594 cw(c72.649,63.594) 72.979,63.594 72.979,62.827 ccw(c73.096,62.827) 73.214,62.827 73.214,63.594 cw(c73.543,63.594) 73.873,63.594 73.873,62.827 ccw(c73.99,62.827) 74.108,62.827 74.108,63.108 cw(c74.437,63.108) 74.437,63.437 75.113,63.437 75.312,63.238 76.563,61.987 85.638,61.987 85.981,61.644 85.981,61.211 86.175,61.017 v1(86.175,61.012)
FMC.HA_P12: IC4.F3 J5.f13 | length 45.8
  TopLayer w0.085: J5.f13@61.878,63.149 62.488,63.759 v1(62.488,63.78) ; v1(85.948,59.9) 85.737,60.111 85.737,60.287 85.794,60.344 86.025,60.344 86.1,60.344 ; 86.1,60.344 86.253,60.344 cw(c86.253,60.252) 86.345,60.252 86.345,60.239 ccw(c86.438,60.239) 86.438,60.146 ccw(c86.438,60.239) 86.53,60.239 86.53,60.252 cw(c86.623,60.252) 86.623,60.344 cw(c86.623,60.252) 86.715,60.252 86.715,60.239 ccw(c86.808,60.239) 86.808,60.146 ccw(c86.808,60.239) 86.9,60.239 86.9,60.252 cw(c86.993,60.252) 86.993,60.344 87.299,60.344 91.812,60.344 91.92,60.236 91.92,60.028 IC4.F3@91.998,59.95
  BottomLayer w0.085: v1(62.488,63.78) 62.488,63.363 62.6,63.251 62.982,63.251 63.108,63.125 65.375,63.125 66.372,62.128 74.471,62.128 75.975,60.625 77.15,60.625 77.299,60.625 ccw(c77.299,60.742) 77.416,60.742 77.416,61.132 cw(c77.746,61.132) 78.075,61.132 78.075,60.216 ccw(c78.193,60.216) 78.31,60.216 78.31,61.132 cw(c78.64,61.132) 78.969,61.132 78.969,60.216 ccw(c79.087,60.216) 79.204,60.216 79.204,61.132 cw(c79.534,61.132) 79.863,61.132 79.863,60.216 ccw(c79.981,60.216) 80.098,60.216 80.098,61.132 cw(c80.428,61.132) 80.757,61.132 80.757,60.216 ccw(c80.875,60.216) 80.992,60.216 80.992,61.132 cw(c81.322,61.132) 81.651,61.132 81.651,60.31 ccw(c81.769,60.31) 81.886,60.31 81.886,60.743 cw(c82.216,60.743) 82.545,60.743 ccw(c82.663,60.742) 82.663,60.625 83.425,60.625 85.392,60.625 85.754,60.263 85.754,60.099 85.948,59.905 v1(85.948,59.9)
FMC.HA_P13: IC4.B1 J5.e12 | length 35.3
  TopLayer w0.085: J5.e12@63.148,64.419 63.148,63.967 63.225,63.89 63.295,63.89 63.357,63.952 63.495,63.952 63.723,64.18 v1(63.723,64.25) ; v1(86.585,67.012) 86.589,67.008 86.589,66.734 87.299,66.024 87.773,65.55 90.413,65.55 90.612,65.351 90.612,64.51 90.438,64.336 90.048,64.336 89.998,64.286 IC4.B1@89.998,63.95
  MidLayer2 w0.11: v1(63.723,64.25) 63.942,64.031 64.102,64.031 64.633,64.562 67.945,64.562 68.401,65.018 71.818,65.018 73.612,66.812 77.537,66.812 80.962,70.237 83.773,70.237 86.22,67.79 86.22,67.121 86.309,67.032 86.565,67.032 v1(86.585,67.012)
FMC.HA_P14: IC4.P2 J5.j15 | length 43.9
  TopLayer w0.085: J5.j15@58.068,60.609 58.678,61.219 v1(58.678,61.24) ; v1(83.923,54.877) 83.923,54.87 84.116,54.677 84.116,54.459 86.232,52.344 90.85,52.344 90.939,52.255 90.939,52.009 IC4.P2@90.998,51.95
  BottomLayer w0.085: v1(58.678,61.24) 58.678,60.761 58.728,60.711 60.052,60.711 60.7,60.063 60.7,58.4 60.925,58.175 63.825,58.175 64.952,57.048 71.751,57.048 74.5,54.3 78.175,54.3 78.818,54.3 ccw(c78.818,54.492) 79.011,54.492 79.011,54.995 cw(c79.415,54.995) 79.415,55.399 cw(c79.415,54.995) 79.82,54.995 79.82,53.959 ccw(c80.012,53.959) 80.012,53.767 ccw(c80.012,53.959) 80.205,53.959 80.205,54.995 cw(c80.609,54.995) 80.609,55.399 cw(c80.609,54.995) 81.014,54.995 81.014,54.492 ccw(c81.206,54.492) 81.206,54.3 81.952,54.3 83.81,54.3 84.116,54.606 84.116,54.677 83.923,54.87 v1(83.923,54.877)
FMC.HA_P15: IC4.K2 J5.f16 | length 47.4
  TopLayer w0.085: J5.f16@61.878,59.339 62.488,59.949 v1(62.488,59.97) ; v1(85.023,56.892) 85.023,56.897 84.829,57.091 84.829,57.161 85.018,57.35 90.175,57.35 90.379,57.146 90.379,56.518 90.553,56.344 90.948,56.344 90.998,56.294 IC4.K2@90.998,55.95
  BottomLayer w0.085: v1(62.488,59.97) 62.488,59.491 62.538,59.441 63.509,59.441 63.75,59.2 63.9,59.05 64.238,58.712 71.688,58.712 72.938,57.462 73.44,57.462 74.387,57.462 cw(c74.387,57.058) 74.792,57.058 ccw(c74.984,57.057) 74.984,56.865 ccw(c74.984,57.057) 75.177,57.057 75.177,57.217 cw(c75.581,57.217) 75.581,57.621 cw(c75.581,57.217) 75.986,57.217 75.986,56.429 ccw(c76.178,56.429) 76.178,56.236 ccw(c76.178,56.429) 76.371,56.429 76.371,57.217 cw(c76.775,57.217) 76.775,57.621 cw(c76.775,57.217) 77.18,57.217 77.18,56.137 ccw(c77.372,56.137) 77.372,55.945 ccw(c77.372,56.137) 77.565,56.137 77.565,57.217 cw(c77.969,57.217) 77.969,57.621 cw(c77.969,57.217) 78.374,57.217 78.374,56.137 ccw(c78.566,56.137) 78.566,55.945 ccw(c78.566,56.137) 78.759,56.137 78.759,57.217 cw(c79.163,57.217) 79.163,57.621 cw(c79.163,57.217) 79.568,57.217 79.568,56.137 ccw(c79.76,56.137) 79.76,55.945 ccw(c79.76,56.137) 79.953,56.137 79.953,57.217 cw(c80.357,57.217) 80.357,57.621 cw(c80.357,57.217) 80.762,57.217 80.762,56.137 ccw(c80.954,56.137) 80.954,55.945 ccw(c80.954,56.137) 81.147,56.137 81.147,57.058 cw(c81.551,57.058) 81.551,57.462 81.7,57.462 83.187,57.462 83.462,57.737 84.48,57.737 84.829,57.388 84.829,57.255 84.829,57.091 85.023,56.897 v1(85.023,56.892)